# Allegro board mib_fp_ethernet_03.brd
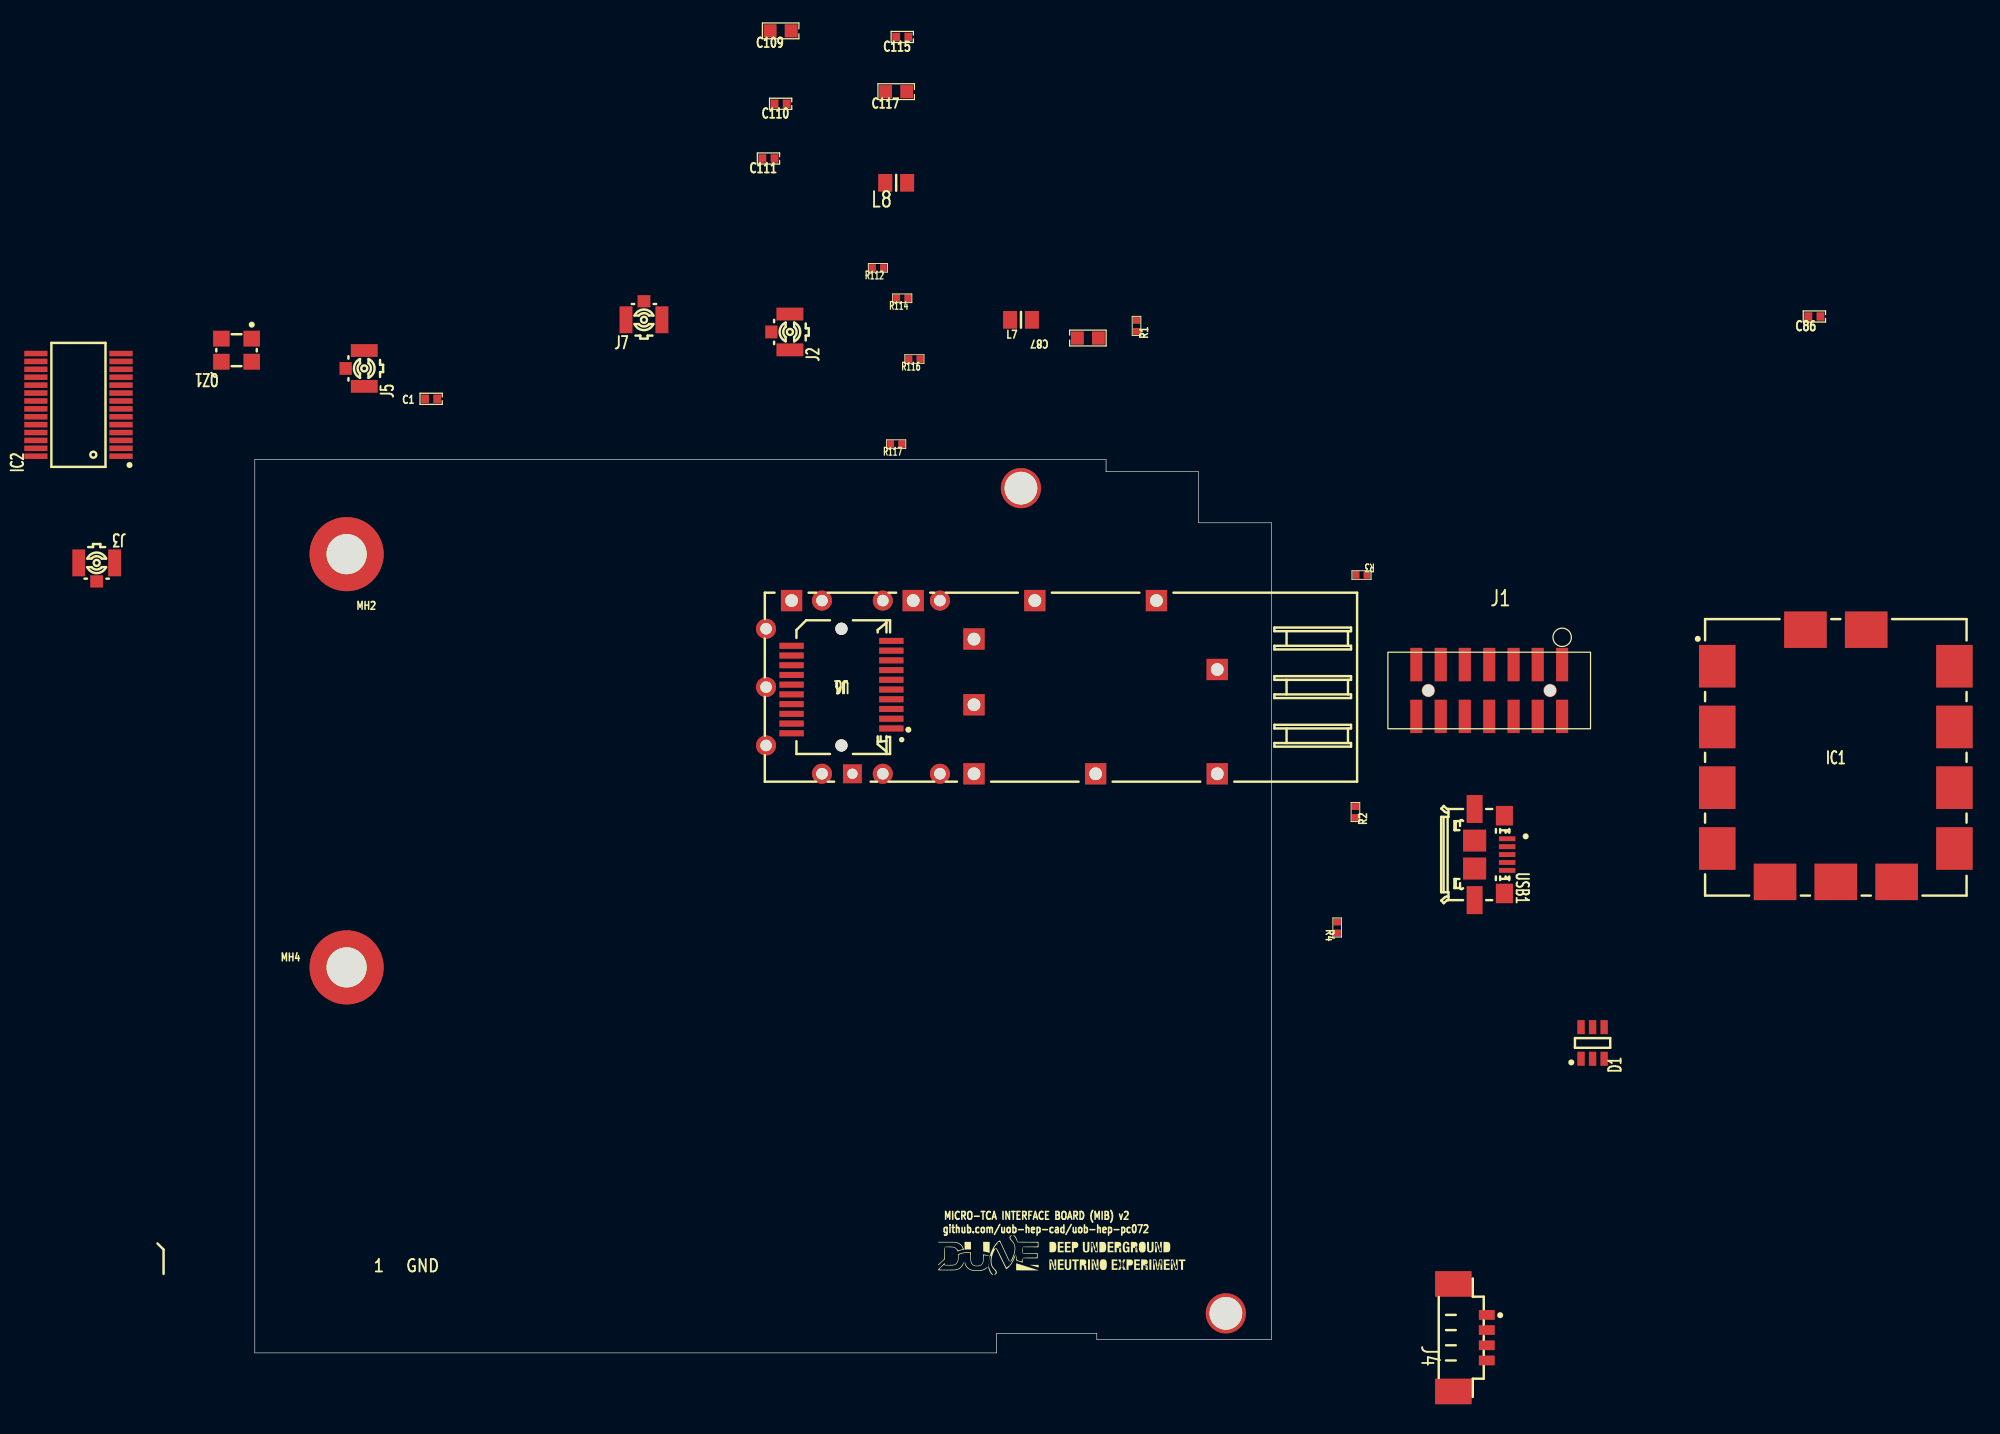
[diagram p0: board, top side]
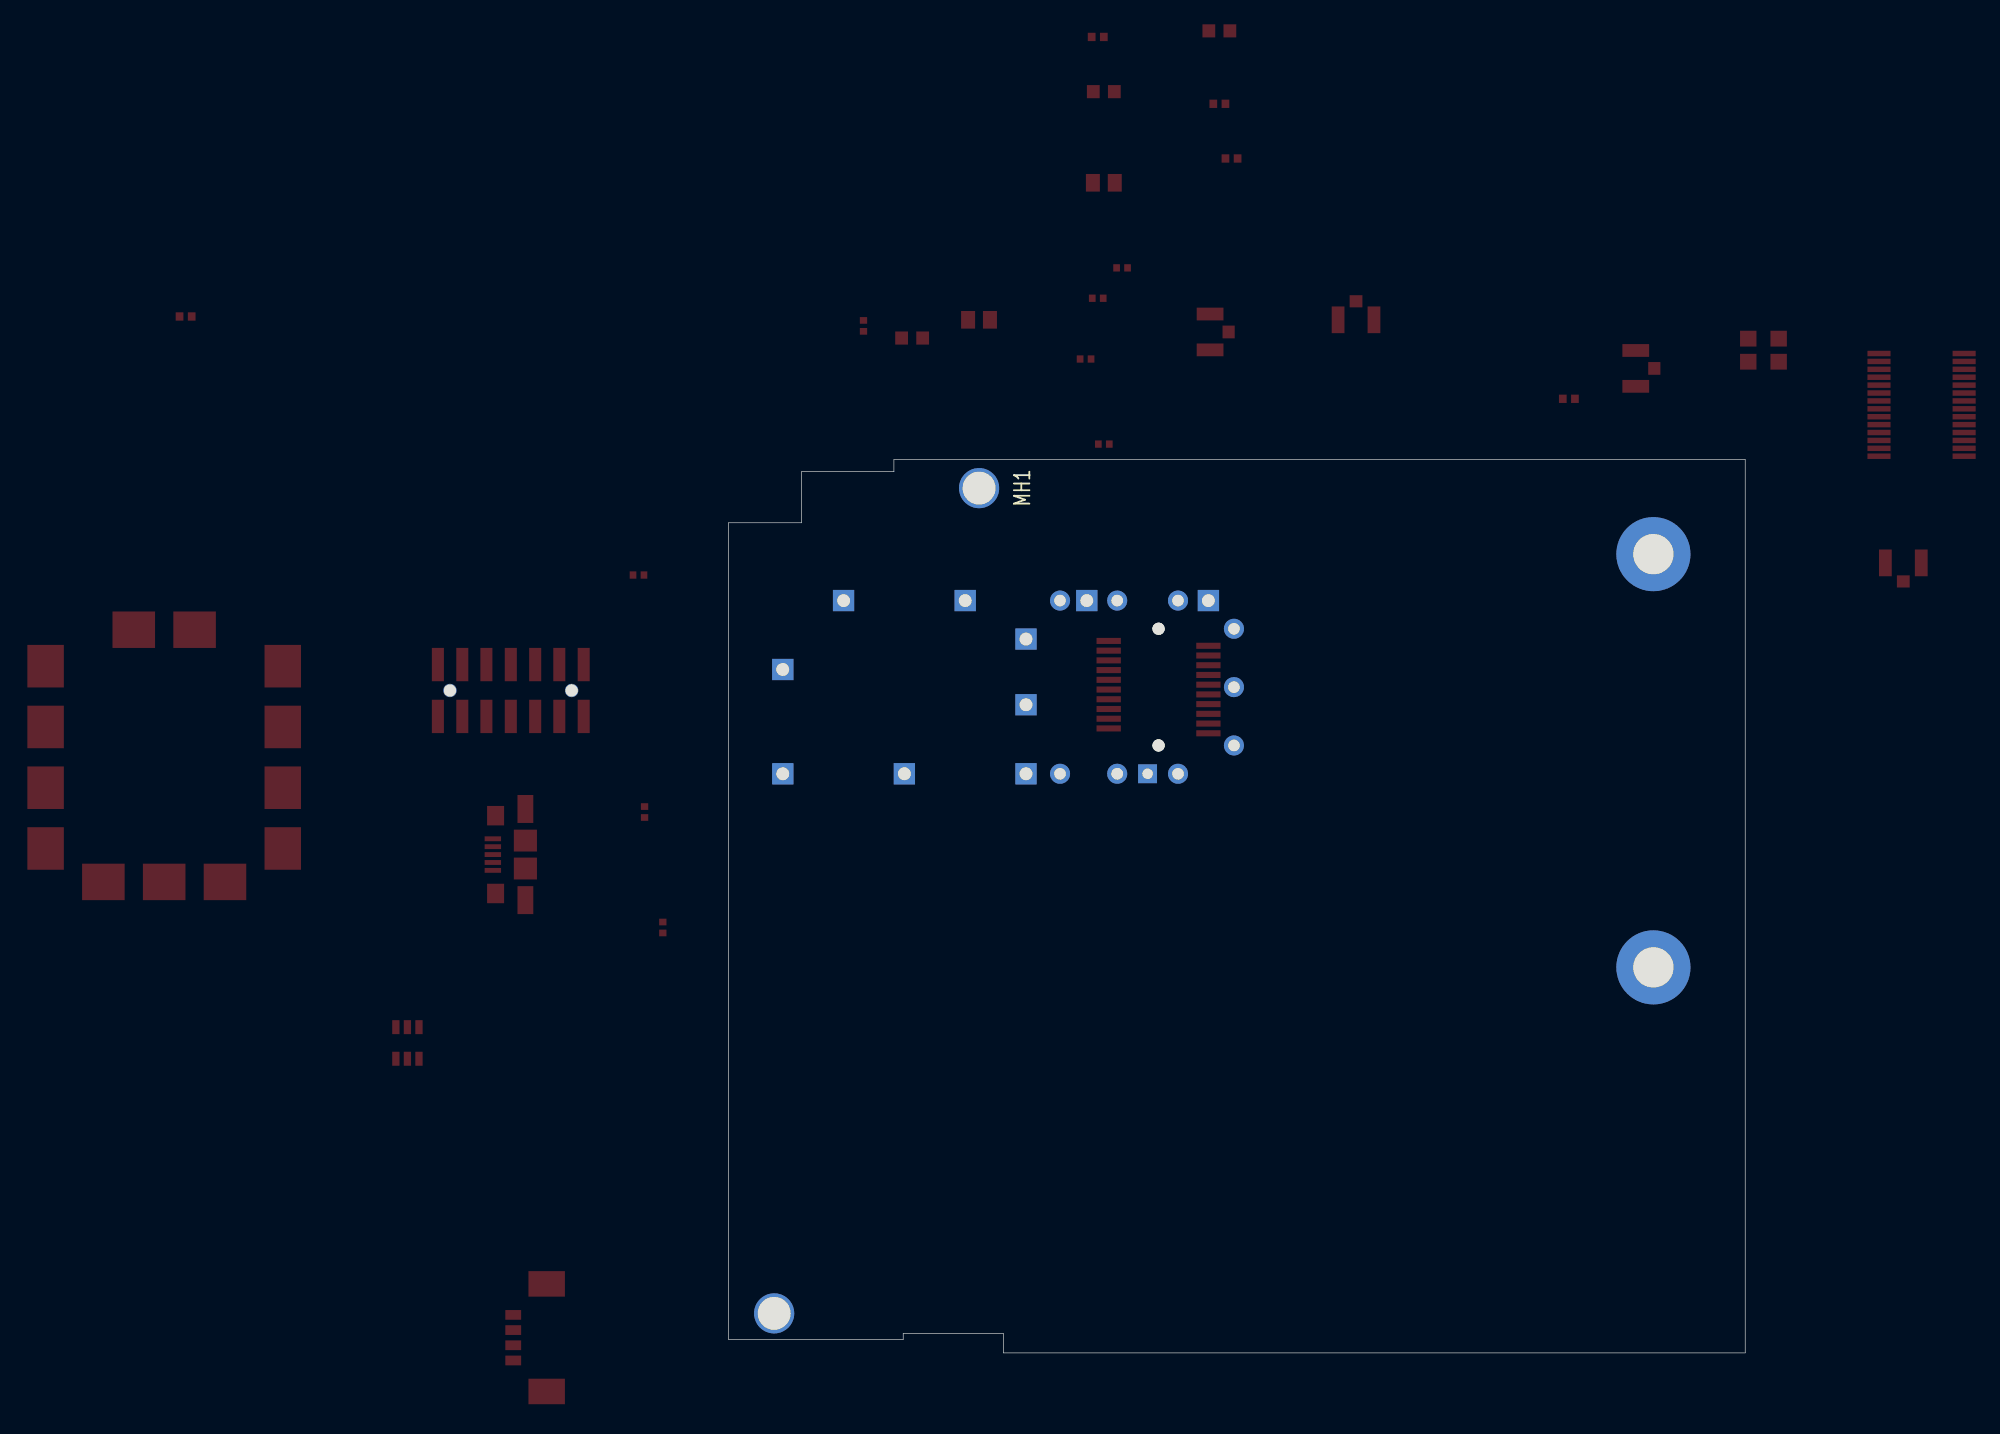
[diagram p1: board, bottom side, seen from below]

Outline 83.59 x 73.5 mm; copper layers: TOP, 02_GND, 03_GND, BOTTOM. Coordinates in mm from the lower left corner of the outline.
Outline path: 0,73.5 70,73.5 70,72.5 77.59,72.5 77.59,68.3 83.59,68.3 83.59,1.1 69.24,1.1 69.24,1.6 61,1.6 61,0 0,0 0,73.5

## Design rules (mm)
constraint set DEFAULT: min track width 0.127
net group FPGA_TMS: nets FPGA_TMS TMS
net group RATE_SELECT: nets LOS RATE_SELECT TX_FAULT VCC3V3

## Placement (name value [footprint] x y rotation side)
C1  0.1UF  [CAP0402]  14.5 78.5 0 top
C86  0.1UF  [CAP0402]  128.24 85.27 0 top
C87  10UF  [CAP0603]  68.5 83.5 180 top
C109  22UF  [CAP0603]  43.24 108.77 0 top
C110  1UF  [CAP0402]  43.24 102.77 0 top
C111  0.1UF  [CAP0402]  42.24 98.27 0 top
C115  0.1UF  [CAP0402]  53.24 108.27 0 top
C117  22UF  [CAP0603]  52.74 103.77 0 top
D1  -  [SOT95P280X145-6N]  110 25.5 90 top
IC1  -  [DIGILENT_JTAG-SMT2-NC]  130 49 0 top
IC2  -  [SOP65P780X200-28N]  -14.5 78 180 top
J1  7X2RECPT_SMD_2MM  [HDR14PINSMD]  101.5 54.5 0 top
J2  -  [HIROSE_U-FL-R-SMT-1_10]  44 84 90 top
J3  -  [HIROSE_U-FL-R-SMT-1_10]  -13 65 180 top
J4  -  [MOLEX_53398-0471]  99.5 2.5 270 top
J5  -  [HIROSE_U-FL-R-SMT-1_10]  9 81 90 top
J6  1367073-1  [TYCO_1367073]  48.24 54.77 180 top
J7  -  [HIROSE_U-FL-R-SMT-1_10]  32 85 0 top
L7  1 UH  [INDC2013X105N]  63 85 0 top
L8  1 UH  [INDC2013X105N]  52.74 96.27 0 top
MH1  MT_HOLE  [MOUNTHOLE]  63 71.15 180 bottom
MH2  MT_HOLE  [MOUNTHOLE]  7.55 65.72 0 top
MH3  MT_HOLE  [MOUNTHOLE]  79.84 3.25 180 bottom
MH4  MT_HOLE  [MOUNTHOLE]  7.55 31.72 0 top
NOREF  -  []  60.37 0 90 top
NOREF#2  -  []  45.94 4.81 0 top
NOREF#3  -  []  61 0.73 0 top
NOREF#4  -  []  -97 0 0 top
NOREF#5  -  []  81.31 68.3 90 top
NOREF#6  -  []  56.2 6.4 0 top
NOREF#7  -  []  -352.83 -99.62 0 top
NOREF#8  -  []  70 73.04 0 top
QZ1  25MHz  [OSCCC250X320X80-4N]  -1.5 82.5 270 top
R1  24.9  [RES0402]  72.5 84.5 90 top
R2  24.9  [RES0402]  90.5 44.5 90 top
R3  24.9  [RES0402]  91 64 180 top
R4  24.9  [RES0402]  89 35 270 top
R112  4.99K  [RES0402]  51.24 89.27 0 top
R114  4.99K  [RES0402]  53.24 86.77 0 top
R116  4.99K  [RES0402]  54.24 81.77 0 top
R117  4.99K  [RES0402]  52.74 74.77 0 top
U1  2227023-1  [SFP_CAGE]  48.24 54.77 180 top
USB1  -  [TYCO_1981584-1]  101.5 41 0 top

## Library data of the parts
C1 = CAP_NP: Tolerance: TOL?; User Part Number: 445-7348-2-ND; part number: CAP_NP-445-7348-2-ND,CAP_NP; room: JTAG
C86 C111 C115 = CAP_NP: Tolerance: TOL?; User Part Number: 445-7348-2-ND; part number: CAP_NP-445-7348-2-ND,CAP_NP; room: SFP0
C87 = CAP_NP: Tolerance: TOL?; User Part Number: GRM188R61A106KE69D; part number: CAP_NP-GRM188R61A106KE69D,CAP_NP; room: SFP0
C109 C117 = CAP_NP: Tolerance: TOL?; User Part Number: GRM188R60J226MEA0D; part number: CAP_NP-GRM188R60J226MEA0D,CAP_NP; room: SFP0
C110 = CAP_NP: Tolerance: TOL?; User Part Number: GRT155R61E105ME01D; part number: CAP_NP-GRT155R61E105ME01D,CAP_NP; room: SFP0
D1 = USBLC6-2: part number: USBLC6-2SC6
IC1 = JTAG-SMT2: part number: JTAG-SMT2_SMD-JTAG-SMT2-NC
IC2 = FT232R: part number: FT232RL
J1 = 7X2RECPT_SMD_2MM: User Part Number: 878321420; part number: 7X2RECPT_SMD_2MM-878321420,7X2RECPT_SMD_2MM; room: JTAG
J2 J3 J5 J7 = PCOAX: part number: PCOAX-U.FL-R-SMT-1(10)
J4 = CON4P: part number: CON4P-53398-0471
J6 = CON20P_SFP-1367073-1: part number: CON20P_SFP-1367073-1-1367073-1,CON20P_SFP-1367073-1; room: SFP0
L7 L8 = IND: part number: IND-CIGT201208EH1R0MNE,IND
MH1 MH2 = MT_HOLE: part number: MT_HOLE-MT_HOLE,MT_HOLE; room: TE0712
MH3 MH4 = MT_HOLE: part number: MT_HOLE-MT_HOLE,MT_HOLE
QZ1 = XTAL_4P: part number: 7M-25.000MEEQ-T
R1-R4 = R: Tolerance: TOL?; User Part Number: 311-24.9LRCT-ND; part number: R-311-24.9LRCT-ND,R; room: JTAG
R112 R114 R116 R117 = R: Tolerance: TOL?; User Part Number: ERJ-2RKF4991X; part number: R-ERJ-2RKF4991X,R; room: SFP0
U1 = SFP_CAGE-2227023-1: part number: SFP_CAGE-2227023-1-2227023-1,SFP_CAGE-2227023-1; room: SFP0
USB1 = CON5P_USB: part number: CON5P_USB-1981584-1

## Footprints (pads in the part's own frame, mm; a bottom-side part is the same pattern mirrored in y, then rotated)
CAP0402
  rect 0.635x0.686 smd: 1(-0.499,0) 2(0.499,0)
CAP0603
  rect 1.05x1.08 smd: 1(-0.865,0) 2(0.865,0)
DIGILENT_JTAG-SMT2-NC
  rect 3x3.5 smd: 1(-9.75,7.5) 2(-9.75,2.5) 3(-9.75,-2.5) 4(-9.75,-7.5) 8(9.75,-7.5) 9(9.75,-2.5) 10(9.75,2.5) 11(9.75,7.5)
  rect 3.5x3 smd: 5(-5,-10.25) 6(0,-10.25) 7(5,-10.25) 12(2.5,10.5) 13(-2.5,10.5)
HDR14PINSMD
  round 1.092 hole 0.991 unplated: (-5.004,0) (5.004,0)
  rect 0.991x2.743 smd: 1(5.994,2.134) 2(5.994,-2.134) 3(3.988,2.134) 4(3.988,-2.134) 5(2.007,2.134) 6(2.007,-2.134) 7(0,2.134) 8(0,-2.134) 9(-2.007,2.134) 10(-2.007,-2.134) 11(-3.988,2.134) 12(-3.988,-2.134) 13(-5.994,2.134) 14(-5.994,-2.134)
HIROSE_U-FL-R-SMT-1_10
  rect 1.05x1 smd: 1(0,1.525)
  rect 1.05x2.2 smd: 2(-1.475,0) 3(1.475,0)
INDC2013X105N
  rect 1.15x1.45 smd: 1(-0.9,0) 2(0.9,0)
MOLEX_53398-0471
  rect 2.1x3 smd: (-3.175,-0.95) (5.675,-0.95)
  rect 0.8x1.3 smd: 1(-0.625,1.8) 2(0.625,1.8) 3(1.875,1.8) 4(3.125,1.8)
MOUNTHOLE
  round 6.096 hole 3.302: 1(0,0)
OSCCC250X320X80-4N
  rect 1.3x1.35 smd: 1(-0.95,1.25) 2(-0.95,-1.25) 3(0.95,-1.25) 4(0.95,1.25)
RES0402
  rect 0.55x0.6 smd: 1(-0.45,0) 2(0.45,0)
SFP_CAGE
  rect 1.75x1.75 hole 1.05: 1(-30.9,7.125) 2(-20.9,7.125) 3(-10.9,7.125) 5(-25.9,-7.125) 6(-15.9,-7.125) 7(-5.9,-7.125) 8(4.1,-7.125) 9(-30.9,-1.455) 10(-10.9,1.445) 11(-10.9,-3.955)
  rect 1.55x1.55 hole 0.85: 4(-0.9,7.125)
  round 1.65 hole 0.95: 12(-8.1,7.125) 13(-3.4,7.125) 14(1.6,7.125) 15(-8.1,-7.125) 16(-3.4,-7.125) 17(1.6,-7.125) 18(6.2,-4.805) 19(6.2,-0.005) 20(6.2,4.796)
SOP65P780X200-28N
  rect 1.9x0.45 smd: 1(-3.5,4.225) 2(-3.5,3.575) 3(-3.5,2.925) 4(-3.5,2.275) 5(-3.5,1.625) 6(-3.5,0.975) 7(-3.5,0.325) 8(-3.5,-0.325) 9(-3.5,-0.975) 10(-3.5,-1.625) 11(-3.5,-2.275) 12(-3.5,-2.925) 13(-3.5,-3.575) 14(-3.5,-4.225) 15(3.5,-4.225) 16(3.5,-3.575) 17(3.5,-2.925) 18(3.5,-2.275) 19(3.5,-1.625) 20(3.5,-0.975) 21(3.5,-0.325) 22(3.5,0.325) 23(3.5,0.975) 24(3.5,1.625) 25(3.5,2.275) 26(3.5,2.925) 27(3.5,3.575) 28(3.5,4.225)
SOT95P280X145-6N
  rect 1.15x0.6 smd: 1(-1.3,0.95) 2(-1.3,0) 3(-1.3,-0.95) 4(1.3,-0.95) 5(1.3,0) 6(1.3,0.95)
TYCO_1367073
  round 1 hole 1.55 unplated: (0,4.795) (0,-4.805)
  rect 2x0.5 smd: 1(-4.1,3.395) 2(-4.1,2.595) 3(-4.1,1.795) 4(-4.1,0.995) 5(-4.1,0.195) 6(-4.1,-0.605) 7(-4.1,-1.405) 8(-4.1,-2.205) 9(-4.1,-3.005) 10(-4.1,-3.805) 11(4.1,-3.405) 12(4.1,-2.605) 13(4.1,-1.805) 14(4.1,-1.005) 15(4.1,-0.205) 16(4.1,0.595) 17(4.1,1.395) 18(4.1,2.195) 19(4.1,2.995) 20(4.1,3.795)
TYCO_1981584-1
  rect 1.35x0.4 smd: 1(1.475,1.3) 2(1.475,0.65) 3(1.475,0) 4(1.475,-0.65) 5(1.475,-1.3)
  rect 1.4x1.6 smd: 6(1.25,3.2) 7(1.25,-3.2)
  rect 1.3x2.3 smd: 8(-1.2,-3.75) 11(-1.2,3.75)
  rect 1.9x1.8 smd: 9(-1.2,-1.15) 10(-1.2,1.15)

## Nets
AGND: IC2.25
GND: C1.2 C86.2 C87.2 C109.2 C110.2 C111.2 C115.2 C117.2 IC1.1 IC1.10 IC2.7 IC2.18 IC2.21 J1.1 J1.3 J1.5 J1.7 J1.9 J1.11 J2.2 J2.3 J3.2 J3.3 J4.1 J5.2 J5.3 J6.1 J6.9 J6.10 J6.11 J6.14 J6.17 J6.20(VEET2) J7.2 J7.3 MH1.1(MH_SIG) MH2.1(MH_SIG) MH3.1(MH_SIG) MH4.1(MH_SIG) QZ1.2 QZ1.4 R116.2 U1.1 U1.2 U1.3 U1.4 U1.5 U1.6 U1.7 U1.8 U1.9 U1.10 U1.11 U1.12 U1.13 U1.14 U1.15 U1.16 U1.17 U1.18 U1.19(CG_9) U1.20
VCC: IC2.20
VCC3V3: C86.1 C87.1 J4.3 L7.1 L8.2 R112.1 R114.1 R117.1
VCCIO: IC2.4
VCCR_3V3: C109.1 C110.1 C111.1 J6.15 L7.2
VCCT_3V3: C115.1 C117.1 J6.16 L8.1
VDD: IC1.11
FPGA_TCK: IC1.2 R2.2
FPGA_TDI: IC1.3 R4.2
FPGA_TDO: IC1.8 R3.2
FPGA_TMS: IC1.4 R1.2
LOS: J6.8 R112.2
RATE_SELECT: J6.7 R114.2
RD_N: J6.12 J7.1(A)
RD_P: J5.1(A) J6.13
SCL: J6.5
SDA: J6.4
SHIELD: USB1.6 USB1.7 USB1.8 USB1.9 USB1.10 USB1.11
TCK: J1.6 R2.1
TD_N: J3.1(A) J6.19
TD_P: J2.1(A) J6.18
TDI: J1.10 R4.1
TDO: J1.8 R3.1
TMS: J1.4 R1.1
TX_DISABLE: J6.3 R116.1
TX_FAULT: J6.2 R117.2
UART_RX_TO_FPGA_3V3: IC2.1 J4.2
UART_TX_FROM_FPGA_3V3: IC2.5 J4.4(A<3>)
VREF_JTAG: C1.1 IC1.9(VREF) J1.2

Pads without a net: D1 1 2 3 4 5 6; IC1 5 6 7 12 13; IC2 2 3 6 8 9 10 11 12 13 14 15 16 17 19 22 23 24 26 27 28; J1 12 13 14; J6 6; QZ1 1 3; USB1 1 2 3 4 5

## Copper pours and planes (outline as drawn; the poured copper is in the pictures)
GND on 02_GND: 60.36,0.64 0.5,0.64 0.5,72.86 69.36,72.86 69.36,71.86 76.96,71.86 76.96,67.67 82.96,67.67 82.96,1.74 69.87,1.74 69.87,2.23 60.36,2.23 ; 1 cut-out
GND on 03_GND: 60.36,0.64 0.5,0.64 0.5,72.86 69.36,72.86 69.36,71.86 76.96,71.86 76.96,67.67 82.96,67.67 82.96,1.74 69.87,1.74 69.87,2.23 60.36,2.23

## Text on the board
User.Comments: CR_SFP_V0_2 | CR_SFP_V0_3
Ref Des/Silkscreen Top: github.com/uob-hep-cad/uob-hep-pc072 | MICRO-TCA INTERFACE BOARD (MIB) v2 | 1 | GND
XSECTION_CHART: *  SURFACE - AIR 0 MM(+0/-0) | L1 TOP CONDUCTOR - 1OZ_COPPER 0.035 MM(+0.00254/-0.00254) | *  DIELECTRIC - FR-4 0.12 MM(+0/-0) | L2 02_GND PLANE - 1OZ_COPPER 0.035 MM(+0.00254/-0.00254) | *  DIELECTRIC - FR-4 0.2 MM(+0/-0) | L3 03_SIG1 CONDUCTOR - 1OZ_COPPER 0.035 MM(+0.00254/-0.00254) | L4 04_GND PLANE - 1OZ_COPPER 0.035 MM(+0/-0) | L5 05_PWR1 PLANE - 1OZ_COPPER 0.035 MM(+0/-0) | L6 06_GND PLANE - 1OZ_COPPER 0.035 MM(+0.00254/-0.00254) | L7 07_SIG2 CONDUCTOR - 1OZ_COPPER 0.035 MM(+0.00254/-0.00254) | L8 08_GND PLANE - 1OZ_COPPER 0.035 MM(+0.00254/-0.00254) | L9 09_SIG3 CONDUCTOR - 1OZ_COPPER 0.035 MM(+0.00254/-0.00254) | L10 BOTTOM CONDUCTOR - 1OZ_COPPER 0.035 MM(+0.00254/-0.00254) | DESIGN CROSS SECTION CHART | ___________________________ | TOTAL THICKNESS 1.75 MM | 1-10
PAGE_OUTLINE: GODWIN M. MAYERS | 06/19/20 | TEL: 215-898-6809 | EMAIL: MAYERS@HEP.UPENN.EDU | CONTACT: GODWIN M. MAYERS | 209 SOUTH 33RD STREET | PHILADELPHIA PA 19104 | 1 | MICRO-TCA INTERFACE BOARD (MIB) | 06/21/20
User.45: FIGURE | FINISHED_SIZE | 0.254 | 0.3048 | 0.85 | 0.889 | 0.95 | 1.0 | 1.016 | 1.05 | 1.4 | 2.692 | 3.2 | 3.302 | 0.6 | 0.8 | 0.9906 | 1.45 | 1.524 | 1.55 | DRILL CHART: TOP to BOTTOM | ALL UNITS ARE IN MILLIMETERS | TOLERANCE_DRILL | +0.0/-0.0 | +0.0/-0.254 | +0.0/-0.3051 | +0.0008/-0.0008 | PLATED | NON-PLATED | QTY | 4 | 698 | 562 | 3 | 27 | 7 | 10 | 30 | 28 | 2 | 1 | 6 | 1. BOARD THICKNESS: 1.57mm | 2. MATERIAL: FR4 (RoHS COMPLIANT MATERIAL) OR EQUIVALENT. GLASS | 3. ALL HOLES ARE PLATED THROUGH UNLESS OTHERWISE NOTED | 4. 100 OHM DIFFERENTIAL IMPEDENCE ON (TOP, 03_SIG1, 07_SIG2, 09_SIG3, AND BOTTOM) | 5. ALL TOLERANCES +/-3MILS EXCEPT WHERE NOTED | 6. BOARD EDGE CONNECTORS (DETAIL 1) MUST BE BEVELED FOR EASY INSERTION.  SELECTIVE HARD GOLD FINISH FOR EDGE CONTACTS | 7. BOARD HAS CUTOUT  SEE DETAIL 2 | See layers HardGold_Top and HardGold_Bot for locations | BOARD NAME:MICRO-TCA INTERFACE BOARD (MIB)
